# Altium PCB OpenOBW.PcbDoc
Units mm, origin at the board's own origin, x right, y up, seen from the top; angles counter-clockwise.
Board outline 37 x 27 mm, 2 copper layers (Top Layer, Bottom Layer), stack 0.324 mm thick; 43 components, 33 nets, 161 pads, 94 vias.
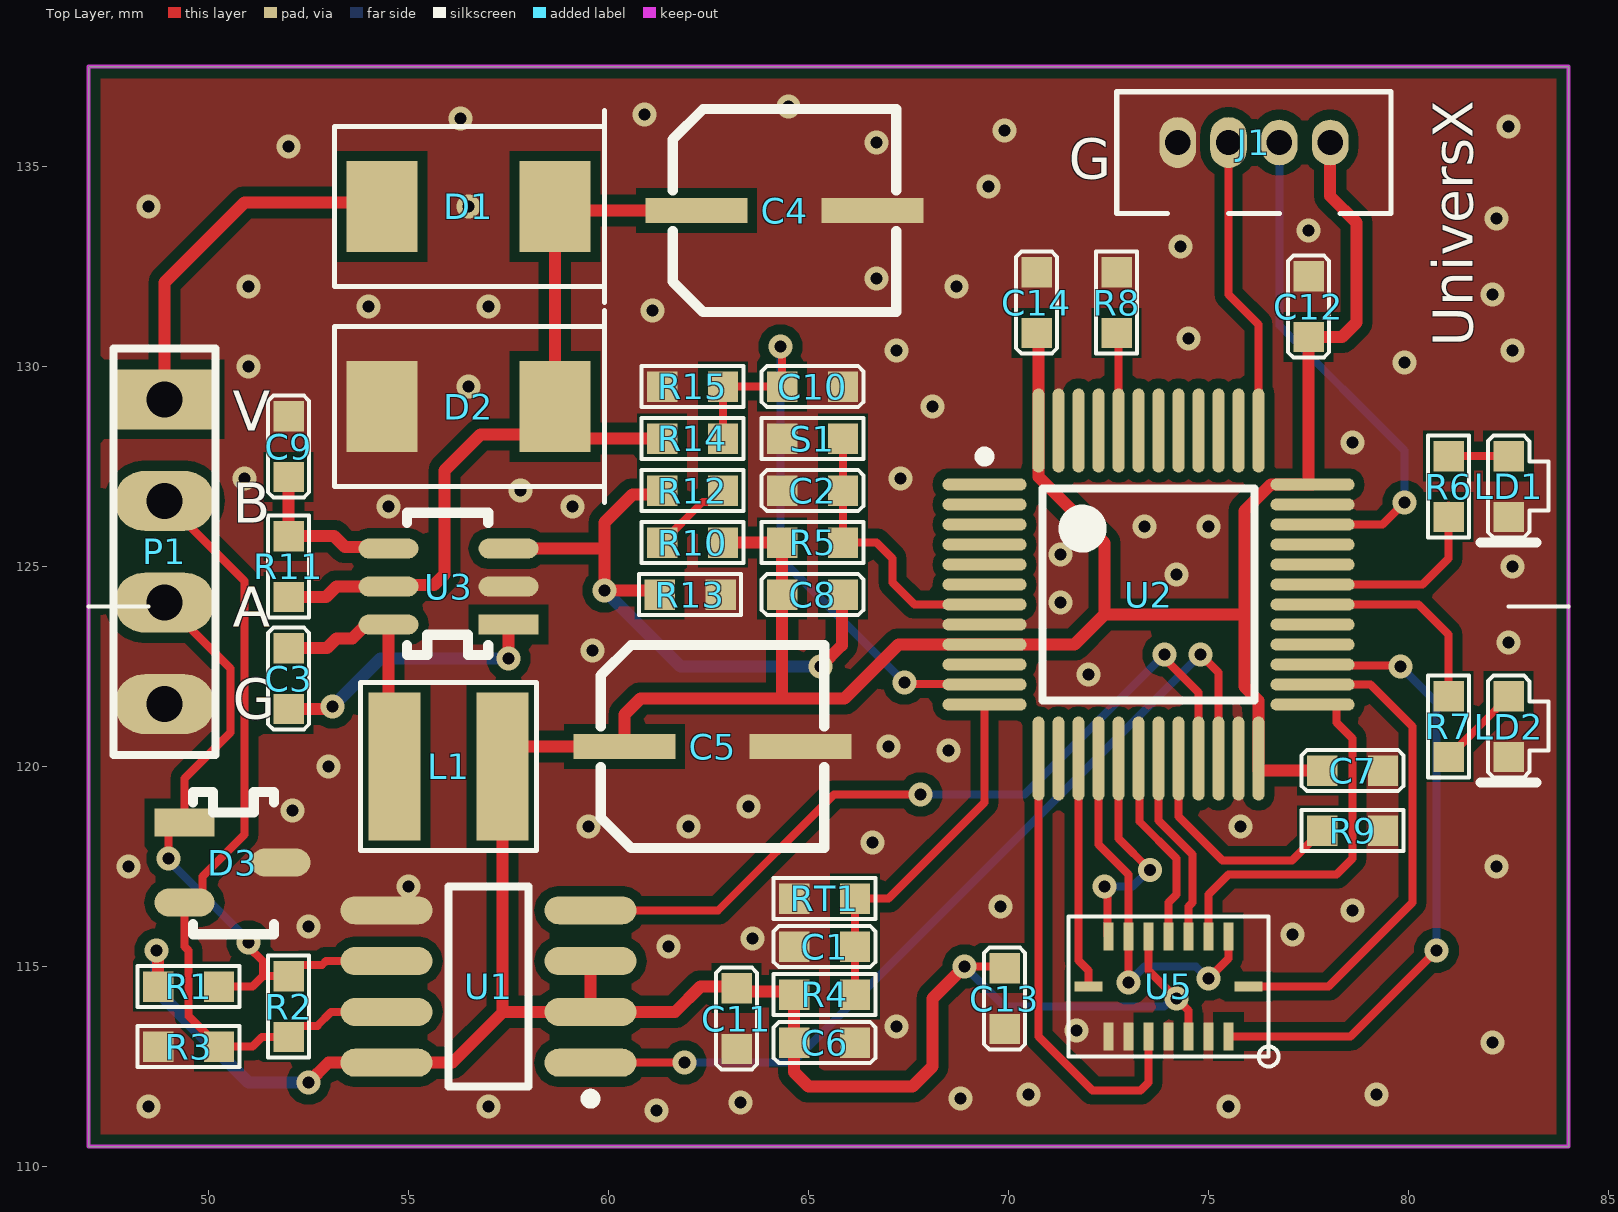
[diagram p0: Top Layer view]
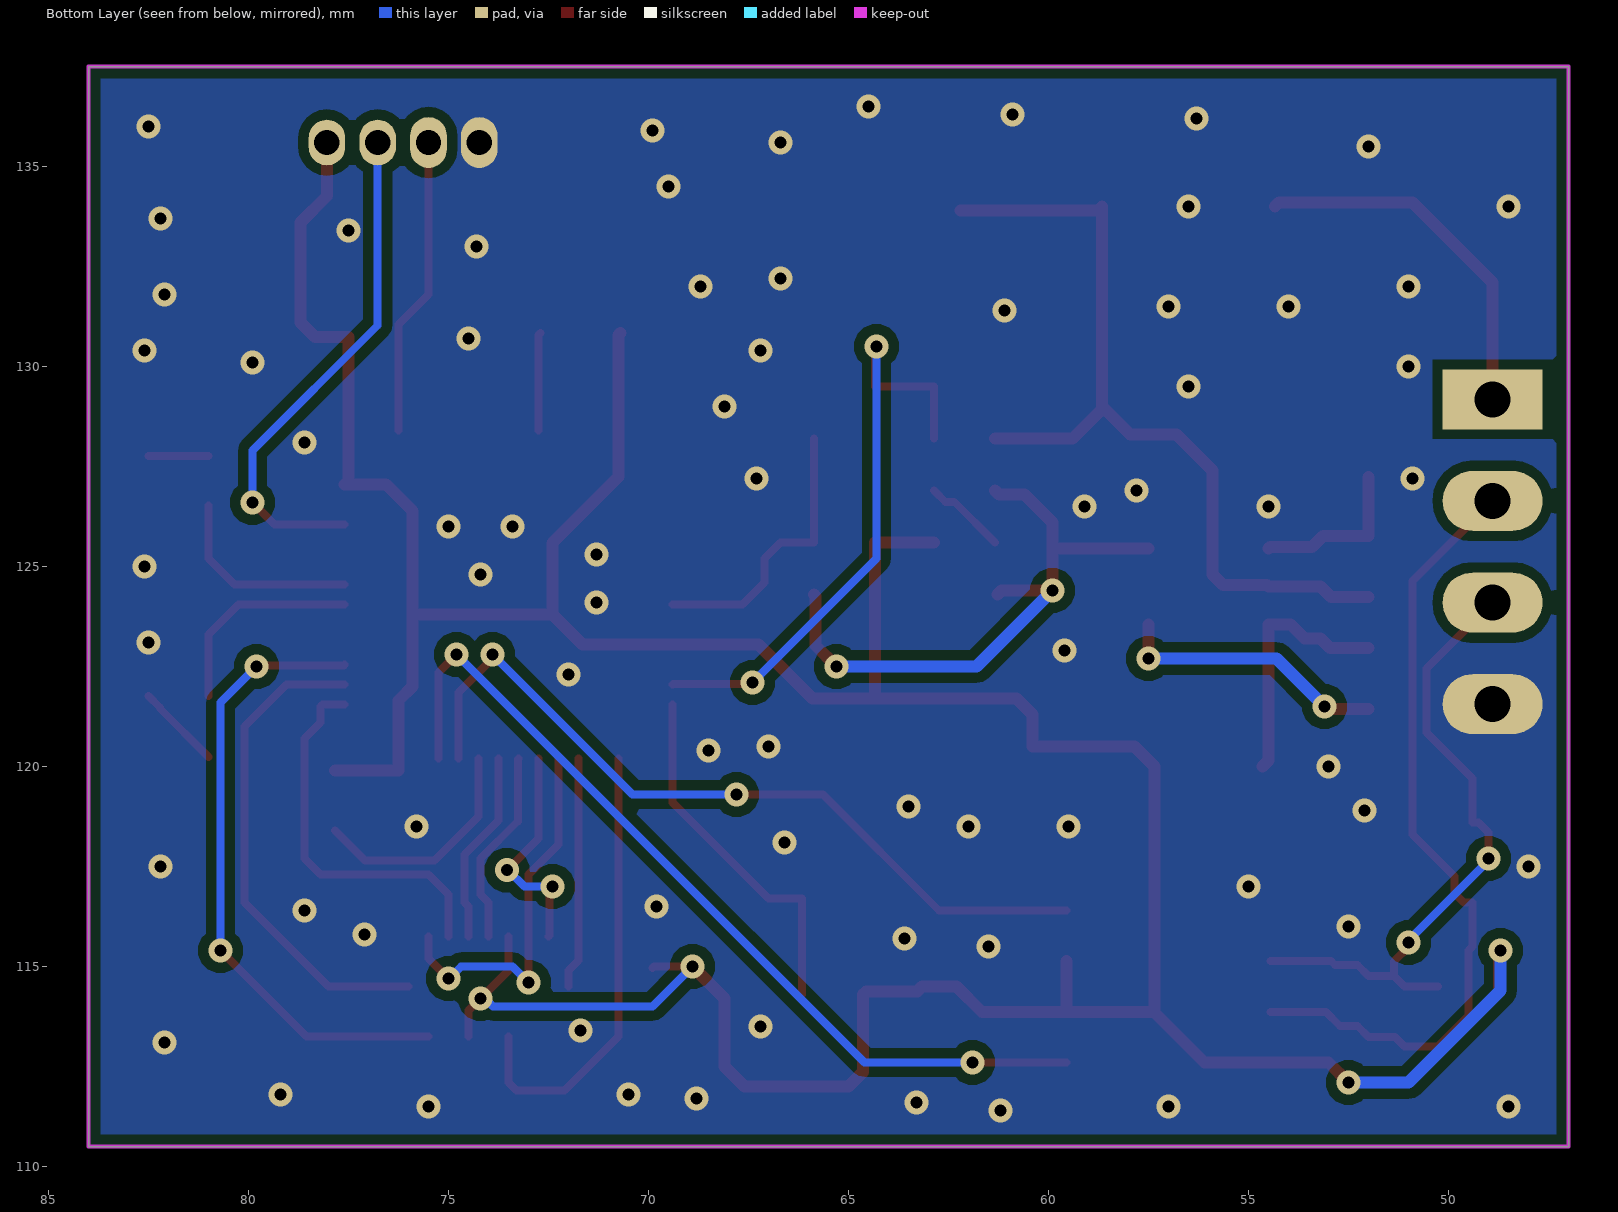
[diagram p1: Bottom Layer view, seen from below]

## Layer stack, top to bottom
Top Solder: solder mask 0.0102, Solder Resist, Dk 3.5
Top Layer: signal copper 0.035
Dielectric 1: core 0.254, FR-4, Dk 4.2
Bottom Layer: signal copper 0.035
Bottom Solder: solder mask 0.0102, Solder Resist, Dk 3.5

## Board outline
47,110.5 47,137.5 84,137.5 84,110.5

## Design rules (kind name [scope] priority, off if disabled: settings)
Clearance Clearance_1 [All vs InPolygon] p1: gap=0.254 ignorepadtopadclearanceinfootprint=FALSE except(0: Arc-Hole Track-Hole SMDPad-Hole THPad-Hole Via-Hole Fill-Hole Poly-Hole Region-Hole Text-Hole)
Clearance [All] p2: gap=0.152 ignorepadtopadclearanceinfootprint=FALSE except(0: Arc-Hole Track-Hole SMDPad-Hole THPad-Hole Via-Hole Fill-Hole Poly-Hole Region-Hole Text-Hole)
ComponentClearance [All] p1: gap=0.254 collisioncheckmode=3 verticalgap=2540 showdistances=FALSE
PlaneConnect [All] p1: planeconnectstyle=Direct reliefexpansion=0.508 reliefentries=4 reliefconductorwidth=0.254 reliefairgap=0.254
PolygonConnect [All] p1: connectstyle=Direct reliefconductorwidth=0.254 reliefentries=4 polygonreliefangle="90 Angle" airgapwidth=0.254
RoutingVias [All] p1: holewidth=0.4 width=0.8 viastyle="Through Hole" minholewidth=0.3 minwidth=0.5 maxholewidth=1 maxwidth=2
SilkToSilkClearance [All] p1 off: silktosilkclearance=0.254
SolderMaskExpansion [All] p1: expansion=0.102 istentingtop=FALSE
Width [All] p1: maxlimit=2.54 minlimit=0.152 preferedwidth=0.254
27 further rules are at their usual default settings.

## Classes and differential pairs
component class power: C3 C4 C5 C6 C7 C8 C9 C10 C11 C12 C13 C14 D1 D2 L1 P1 R10 R11 R12 R13 R14 R15 U3
component class imu: 0.6 R? RP21 RP22 RP23 RP24 RP25 RP26 U5
component class MCU: C1 C2 D3 DC1 J1 LD1 LD2 LD? R1 R2 R3 R4 R5 R6 R7 R8 R9 R110 R112 RT1 S1 U1 U2

## Components (designator, comment, footprint, x,y, rotation, side; value= is the part's Value field where it differs from the comment)
C1 "Cap" 0603C 65.4,115.5 r0 top value=0.1u
C2 "Cap" 0603C 65.1,126.9 r0 top value=0.1u
C3 "Cap" 0603C 52,122.2 r270 top value=0.1u
C4 "Cap Pol1" E0.1 64.4,133.9 r180 top value=10u/50V
C5 "Cap Pol1" E0.1 62.6,120.5 r180 top value=33u/10V
C6 "Cap" 0603C 65.4,113.1 r180 top value=0.1u
C7 "Cap" 0603C 78.6,119.9 r180 top value=0.1u
C8 "Cap" 0603C 65.1,124.3 r180 top value=102
C9 "Cap" 0603C 52,128 r90 top value=0.1u
C10 "Cap" 0603C 65.1,129.5 r180 top value=0.1u
C11 "Cap" 0603C 63.2,113.7 r90 top value=0.1u
C12 "Cap" 0603C 77.5,131.5 r270 top value=0.1u
C13 "Cap" 0603C 69.9,114.2 r90 top value=0.1u
C14 "Cap" 0603C 70.7,131.6 r270 top value=0.1u
D1 "SS110" SMB 56.5,134 r0 top
D2 "SMBJ36CA" SMB 56.5,129 r0 top
D3 "SM712" sot-23 49.1,118.6 r0 top
J1 "Header 4" xhb127-4 78.04,135.6 r180 top
L1 "22uH" MSS4018 56,120 r0 top
LD1 "LED0" 0603d-s 82.5,127 r270 top
LD2 "LED0" 0603d-s 82.5,121 r270 top
P1 "Header 4" HDR1X4 48.9,129.18 r270 top
R1 "Res2" 0603R 49.5,114.5 r0 top value=4.7k
R2 "Res2" 0603R 52,114 r90 top value=DNP
R3 "Res2" 0603R 49.5,113 r0 top value=4.7k
R4 "Res2" 0603R 65.4,114.3 r0 top value=10K
R5 "Res2" 0603R 65.1,125.6 r180 top value=10k
R6 "Res2" 0603R 81,127 r270 top value=510
R7 "Res2" 0603R 81,121 r90 top value=510
R8 "Res2" 0603R 72.7,131.6 r90 top value=100k
R9 "Res2" 0603R 78.6,118.4 r180 top value=100k
R10 "Res2" 0603R 62.1,125.6 r180 top value=30k
R11 "Res2" 0603R 52,125 r90 top value=100k
R12 "Res2" 0603R 62.1,126.9 r0 top value=1.2k
R13 "Res2" 0603R 62.038,124.3 r0 top value=10k
R14 "Res2" 0603R 62.1,128.2 r180 top value=33k
R15 "Res2" 0603R 62.1,129.5 r0 top value=3k
RT1 "10k" 0603R 65.4,116.7 r0 top
S1 "DNP" 0603R 65.1,128.2 r0 top
U1 "MS2548" SOIC127P600-8AM 57,114.5 r180 top
U2 "STM32F103C8T6" TSQFP50P900X900-48M 73.5,124.3 r0 top
U3 "SGM61410" sot-26 57.5,123.55 r180 top
U5 "BMI088" BMI088 74,114.5 r180 top

## Footprints (in the part's own frame and the unit in brackets; to place one, negate y for a bottom-side part, rotate by r counter-clockwise, add the part's x,y. Pads: shape width x height; smd on the part's side, far side on the other; paste and mask are expansions set on the pad)
0603C [mil]
  rect 30x30 smd: 1(-30,0) 2(30,0)
  silkscreen extent -50,-20 50,20
0603d-s [mil]
  rect 30x30 smd: 1(-30,0) 2(30,0)
  silkscreen extent -50,-28 55,39
0603R [mil]
  rect 30x30 smd: 1(-30,0) 2(30,0)
  silkscreen extent -50,-20 50,20
BMI088 [mm]
  rect 0.25x0.7 smd: 1(-1.5,1.25) 2(-1,1.25) 3(-0.5,1.25) 4(0,1.25) 5(0.5,1.25) 6(1,1.25) 7(1.5,1.25) 9(1.5,-1.25) 10(1,-1.25) 11(0.5,-1.25) 12(0,-1.25) 13(-0.5,-1.25) 14(-1,-1.25) 15(-1.5,-1.25)
  rect 0.7x0.25 smd: 8(2,0) 16(-2,0)
  silkscreen extent -2.75,-1.75 2.5,2
E0.1 [mm]
  rect 2.54x0.635 smd: 1(2.2,0) 2(-2.2,0)
  silkscreen extent -2.79,-2.54 2.79,2.54
HDR1X4 [mm] "Connector; Header; 4 Position"
  rect 1.5x2.5 hole 0.9: 1(0,0)
  oval 1.5x2.5 hole 0.9: 2(2.54,0) 3(5.08,0) 4(7.62,0)
  silkscreen extent -1.27,-1.27 8.89,1.27
MSS4018 [mm]
  rect 1.3x3.7 smd: 1(-1.35,0) 2(1.35,0)
  silkscreen extent -2.2,-2.1 2.2,2.1
SMB [mil]
  rect 70x90 smd: 1(-85,0) 2(85,0)
  silkscreen extent -132,-94 134,94
SOIC127P600-8AM [mm] "SOIC, 8-Leads, Body 4.9x3.9mm, Pitch 1.27mm, IPC Low Density"
  oval 2.3x0.7 smd: 1(-2.55,1.905) 2(-2.55,0.635) 3(-2.55,-0.635) 4(-2.55,-1.905) 5(2.55,-1.905) 6(2.55,-0.635) 7(2.55,0.635) 8(2.55,1.905)
  silkscreen extent -2.68,-2.5 1,2.93, body extent -2,-2.5 2,2.5, height 2.72
sot-23 [mm]
  rect 1.5x0.7 smd: 1(0.3,0)
  oval 1.5x0.7 smd: 2(0.3,-2) 3(2.7,-1)
  silkscreen extent 0.51,-2.79 2.54,0.76
sot-26 [mm]
  rect 1.5x0.5 smd: 1(0,0)
  oval 1.5x0.5 smd: 2(0,-0.95) 3(0,-1.9) 4(3,-1.9) 5(3,-0.95) 6(3,0)
  silkscreen extent 0.51,-2.79 2.54,0.76
TSQFP50P900X900-48M [mm] "Thin QFP, 48-Leads, Body 7x7mm, Pitch 0.5mm, IPC Low Density"
  oval 2.1x0.3 smd: 1(-4.1,2.75) 2(-4.1,2.25) 3(-4.1,1.75) 4(-4.1,1.25) 5(-4.1,0.75) 6(-4.1,0.25) 7(-4.1,-0.25) 8(-4.1,-0.75) 9(-4.1,-1.25) 10(-4.1,-1.75) 11(-4.1,-2.25) 12(-4.1,-2.75) 25(4.1,-2.75) 26(4.1,-2.25) 27(4.1,-1.75) 28(4.1,-1.25) 29(4.1,-0.75) 30(4.1,-0.25) 31(4.1,0.25) 32(4.1,0.75) 33(4.1,1.25) 34(4.1,1.75) 35(4.1,2.25) 36(4.1,2.75)
  oval 0.3x2.1 smd: 13(-2.75,-4.1) 14(-2.25,-4.1) 15(-1.75,-4.1) 16(-1.25,-4.1) 17(-0.75,-4.1) 18(-0.25,-4.1) 19(0.25,-4.1) 20(0.75,-4.1) 21(1.25,-4.1) 22(1.75,-4.1) 23(2.25,-4.1) 24(2.75,-4.1) 37(2.75,4.1) 38(2.25,4.1) 39(1.75,4.1) 40(1.25,4.1) 41(0.75,4.1) 42(0.25,4.1) 43(-0.25,4.1) 44(-0.75,4.1) 45(-1.25,4.1) 46(-1.75,4.1) 47(-2.25,4.1) 48(-2.75,4.1)
  silkscreen extent -4.22,-2.65 2.65,3.57, body extent -3.5,-3.5 3.5,3.5, height 1.6
xhb127-4 [mil]
  oval 36x45 hole 25: 1(0,0) 2(50,0)
  oval 36x50 hole 25: 3(100,0) 4(150,0)
  silkscreen extent -60,-50 210,70

## Part data
C1 C2 C3 C6 C7 C8 C9 C10 C11 C12 C13 C14: "Capacitor", LatestRevisionDate=17-Jul-2002, LatestRevisionNote="Re-released for DXP Platform.", PackageDescription="Radial Cap, Thru-Hole; 2 Leads; 0.3 in Pin Spacing", PackageReference=RAD-0.3, Published=8-Jun-2000, Publisher="Altium Limited"
C4 C5: "Polarized Capacitor (Radial)", LatestRevisionDate=17-Jul-2002, LatestRevisionNote="Re-released for DXP Platform.", PackageDescription="Polarized Capacitor (Radial); 2 Leads", PackageReference=RB7.6-15, Published=8-Jun-2000, Publisher="Altium Limited"
D1: library part "D Zener", "Zener Diode", LatestRevisionDate=17-Jul-2002, LatestRevisionNote="Re-released for DXP Platform.", PackageDescription="Diode, Thru-Hole; 2 Leads; 0.7 in Pin Spacing", PackageReference=DIODE-0.7, Published=8-Jun-2000, Publisher="Altium Limited"
D2: library part TVS_B
D3: "7V/12V TVS diodes"
J1 P1: "Header, 4-Pin", LatestRevisionDate=17-Jul-2002, LatestRevisionNote="Re-released for DXP Platform.", Publisher="Altium Limited"
L1: library part "INDUCTORS OF FERRITE", "Power Inductor,3.3uH,0.2,IND_404030", DC Resistor=0.04ohm, Manufacturer=sunlord, Manufacturer PN=SWPA4030S3R3MT, Resonace frequency=38M, Tolerance=20%, Created by=YTL, Irms=2.4A, Isat=3.3A, Part Type=POWER_IND, Priority=A, RK PN=SWPA4030S3R3MT
LD1 LD2: "Typical INFRARED GaAs LED", LatestRevisionDate=08-Jul-2005, LatestRevisionNote="Mech Layer 1 removed.", PackageDescription="LED; 2 Leads", PackageReference=LED-0, Published=8-Jun-2000, Publisher="Altium Limited"
R1 R2 R3 R4 R5 R6 R7 R8 R9 R10 R11 R12 R13 R14 R15: "Resistor", LatestRevisionDate=17-Jul-2002, LatestRevisionNote="Re-released for DXP Platform.", PackageDescription="Axial Device, Thru-Hole; 2 Leads; 0.4 in Pin Spacing", PackageReference=AXIAL-0.4, Published=8-Jun-2000, Publisher="Altium Limited"
RT1: library part "Res Thermal", "Thermistor", Code_IPC=RESC2012, LatestRevisionDate=29-May-2009, LatestRevisionNote="IPC-7351 Footprint Added.", PackageDescription="Chip Resistor 0805 Case Size", PackageReference=6-0805, PackageVersion=Mar-2003, Published=24-Mar-1999, Publisher="Altium Limited"
S1: library part SW-PB, "Switch", LatestRevisionDate=17-Jul-2002, LatestRevisionNote="Re-released for DXP Platform.", PackageDescription="Switch; 2 Leads", PackageReference=SPST-2, Published=24-Mar-1999, Publisher="Altium Limited"
U1: library part MAX13487
U2: library part STM32F101C8T6, "STM32 ARM-based 32-bit MCU with 64 Kbytes Flash, 48-pin LQFP, Industrial Temperature", ComponentLink1Description="Manufacturer Link", ComponentLink1URL=www.st.com/stm32, ComponentLink2Description=Datasheet, ComponentLink2URL=http://www.st.com/stonline/products/literature/ds/13586.pdf, DatasheetVersion="rev6, Mar-2008", PackageDescription="48-Pin Low-Profile Quad Flat Pack, 7 x 7 mm Body, 0.5 mm Pitch (LQFP48)", PackageReference=LQFP48, PackageVersion=Mar-2008, Published=30-May-2008, Publisher="Altium Limited"
U3: library part RY8310

## Via types
v1: diameter 0.6, hole 0.3, Top Layer to Bottom Layer, 94 vias

## Nets (pads, with @x,y where several pads share a name; then routed paths per layer and width w, separated by ;. In a path a pad name is that pad's centre, name@x,y a point inside that pad or via, vN(x,y) a via of type N, cw(c..) or ccw(c..) an arc to the next point about the centre after c; other vN are vias at no path point)
BOOT0: R8.1 U2.44 | length 2.5
  Top Layer w0.2: R8.1 72.75,130.788 U2.44
BOOT1: R9.2 U2.20 | length 5.8
  Top Layer w0.2: U2.20 74.25,118.75 75.348,117.652 77.09,117.652 R9.2
GND: C1.1 C2.1 C4.2 C5.2 C6.1 C7.1 C9.2 C10.1 C11.1 C12.1 C13.1 C14.1 D2.1 D3.3 J1.4 LD1.2 LD2.2 P1.4 R3.1 R8.2 R9.1 R13.2 R15.1 RT1.1 S1.1 U1.5 U2.8 U2.23 U2.35 U2.47 U3.2 U5.2 U5.4 U5.6 U5.7
  other v1: 61.2,111.4 48.5,111.5 57,111.5 75.5,111.5 63.3,111.6 68.8,111.7 70.5,111.8 79.2,111.8 82.1,113.1 71.7,113.4 67.2,113.5 61.5,115.5 63.6,115.7 77.1,115.8 52.5,116 78.6,116.4 69.8,116.5 55,117 48,117.5 82.2,117.5 66.6,118.1 59.5,118.5 62,118.5 75.8,118.5 52.1,118.9 63.5,119 53,120 68.5,120.4 67,120.5 72,122.3 59.6,122.9 82.5,123.1 71.3,124.1 74.2,124.8 82.6,125 71.3,125.3 73.4,126 75,126 54.5,126.5 59.1,126.5 57.8,126.9 50.9,127.2 67.3,127.2 78.6,128.1 68.1,129 56.5,129.5 51,130 79.9,130.1 67.2,130.4 82.6,130.4 74.5,130.7 61.1,131.4 54,131.5 57,131.5 82.1,131.8 51,132 68.7,132 66.7,132.2 74.3,133 77.5,133.4 82.2,133.7 48.5,134 56.5,134 69.5,134.5 52,135.5 66.7,135.6 69.9,135.9 82.5,136 56.3,136.2 60.9,136.3 64.5,136.5
INTA1: U2.26 U5.16 | length 12.3
  Top Layer w0.2: U5.16 78,114.5 80.1,116.6 80.1,121 79.05,122.05 U2.26
INTA2: U2.27 U5.1 | length 15.8
  Top Layer w0.2: U5.1 78.55,113.25 v1(80.7,115.4) ; U2.27 77.619,122.531 79.769,122.531 v1(79.8,122.5)
  Bottom Layer w0.2: v1(79.8,122.5) 80.7,121.6 v1(80.7,115.4)
INTG1: U2.18 U5.12 | length 4.9
  Top Layer w0.2: U2.18 73.269,120.181 73.269,118.631 74.2,117.7 74.2,116.8 74,116.6 U5.12
INTG2: U2.19 U5.13 | length 4.8
  Top Layer w0.2: U2.19 73.75,118.648 74.6,117.798 74.6,116.6 74.5,116.5 U5.13
LED1: R6.2 U2.31 | length 5
  Top Layer w0.2: U2.31 80.35,124.55 81,125.2 R6.2@81,126.523
LED2: R7.2 U2.30 | length 5.2
  Top Layer w0.2: U2.30 80.25,124.05 81,123.3 R7.2
MISO: U2.16 U5.10 U5.15 | length 9.5
  Top Layer w0.2: U2.16 72.25,118.05 73,117.3 U5.10 v1(73,114.6) ; v1(75,114.7) 75.5,115.2 U5.15
  Bottom Layer w0.2: v1(73,114.6) 73.4,115 74.683,115 74.983,114.7 v1(75,114.7)
MOSI: U2.17 U5.9 | length 5.7
  Top Layer w0.2: v1(72.4,117) 72.475,116.925 72.475,115.775 U5.9 ; U2.17 72.75,118.2 v1(73.542,117.408)
  Bottom Layer w0.2: v1(72.4,117) 73.101,117 73.51,117.408 v1(73.542,117.408)
nCSBA: U2.25 U5.14 | length 9.6
  Top Layer w0.2: U5.14 75,116.8 75.5,117.3 78.2,117.3 78.6,117.7 78.6,120.7 78.2,121.1 78.2,121.504 78.154,121.55 U2.25
nCSBG: U2.13 U5.5 | length 11.5
  Top Layer w0.2: U2.13 70.75,113.25 72.1,111.9 73.3,111.9 73.5,112.1 U5.5
NetC3_1: C3.1 L1.1 U3.6 | length 6.4
  Top Layer w0.3: C3.1 52.962,122.962 53.2,123.2 53.596,123.2 53.946,123.55 U3.6 54.5,120.15 L1.1
NetC3_2: C3.2 U3.1 | length 6.9
  Top Layer w0.3: C3.2 52.938,121.438 53,121.5 v1(53.1,121.5) ; v1(57.5,122.7) U3.1
  Bottom Layer w0.3: v1(53.1,121.5) 54.3,122.7 v1(57.5,122.7)
NetC8_1: C8.1 R12.1 R13.1 U3.3 | length 15.5
  Top Layer w0.3: U3.3 59.9,125.45 ; R13.1 61.176,124.4 v1(59.9,124.4) 59.9,125.45 ; R12.1 61.238,126.8 60.6,126.8 59.9,126.1 59.9,125.45 ; v1(65.3,122.5) 65.831,123.031 65.831,124.269 C8.1
  Bottom Layer w0.3: v1(59.9,124.4) 61.8,122.5 v1(65.3,122.5)
NetC9_1: C9.1 R11.2 U3.4 | length 4.1
  Top Layer w0.3: C9.1 R11.2 53.138,125.762 53.412,125.488 54.462,125.488 U3.4
NetLD1_1: LD1.1 R6.1 | length 1.5
  Top Layer w0.2: R6.1 LD1.1
NetLD2_1: LD2.1 R7.1 | length 2.1
  Top Layer w0.2: R7.1 82.219,121.457 82.219,121.481 LD2.1
NetR10_2: R10.2 R12.2 | length 2.1
  Top Layer w0.2: R10.2 62.357,126.619 62.581,126.619 R12.2
NRST: C2.2 R5.1 S1.2 U2.7 | length 7.1
  Top Layer w0.2: S1.2 C2.2 R5.1 66.7,125.6 67.1,125.2 67.1,124.6 67.65,124.05 U2.7
RS485A: D3.1 P1.3 R1.2 R2.2 U1.6 | length 16.2
  Top Layer w0.2: P1.3 50.548,122.452 50.548,120.848 49.4,119.7 D3.1 49.25,118.6 49,118.35 v1(49,117.7) ; R1.2 51.1,114.5 51.362,114.762 ; v1(51,115.6) 51,115.492 51.362,115.13 51.362,114.762 ; U1.6 52.935,115.135 52.843,115.043 52.281,115.043 R2.2 51.362,114.762
  Bottom Layer w0.2: v1(49,117.7) 49,117.65 51,115.65 v1(51,115.6)
RS485B: D3.2 P1.2 R2.1 R3.2 U1.7 | length 20.1
  Top Layer w0.2: P1.2 50.9,124.64 50.9,118.3 49.85,117.25 49.85,116.831 49.619,116.6 D3.2 49.4,115.5 49.5,115.4 49.5,113.762 R3.2 51.1,113 51.338,113.238 R2.1 52.281,113.519 52.719,113.519 53.065,113.865 U1.7
SCK: U2.15 U5.8 | length 5.8
  Top Layer w0.2: U2.15 71.75,115.15 72,114.9 U5.8
SWCLK: J1.3 U2.37 | length 7.5
  Top Layer w0.2: J1.3 75.5,131.8 76.25,131.05 U2.37
SWIO: J1.2 U2.34 | length 12.8
  Top Layer w0.2: U2.34 79.35,126.05 v1(79.9,126.6)
  Bottom Layer w0.2: J1.2 76.77,131.03 79.9,127.9 v1(79.9,126.6)
TEMP: C1.2 R4.2 RT1.2 U2.12 | length 9.1
  Top Layer w0.2: R4.2 C1.2 RT1.2 67,116.7 69.4,119.1 U2.12
URX3: U1.1 U2.22 | length 22.3
  Top Layer w0.2: U1.1 59.553,112.598 61.898,112.598 v1(61.9,112.6) ; v1(74.8,122.8) 75.25,122.35 U2.22
  Bottom Layer w0.2: v1(61.9,112.6) 64.6,112.6 v1(74.8,122.8)
UTX3: U1.4 U2.21 | length 20
  Top Layer w0.2: U1.4 62.743,116.405 65.638,119.3 v1(67.8,119.3) ; v1(73.9,122.8) 73.9,122.7 74.75,121.85 U2.21
  Bottom Layer w0.2: v1(67.8,119.3) 70.4,119.3 v1(73.9,122.8)
V33: C5.1 C6.2 C7.2 C8.2 C11.2 C12.2 C13.2 C14.2 J1.1 L1.2 R1.1 R4.1 R5.2 R10.1 U1.2 U1.3 U1.8 U2.9 U2.24 U2.36 U2.48 U5.3 U5.11 | length 99.2
  Top Layer w0.2: v1(68.9,115) 69.862,115 C13.2 ; U5.11 73.5,114.9 v1(74.2,114.2) 74.2,114.198 74.5,113.898 U5.3
  Top Layer w0.3: v1(48.7,115.4) 48.738,115.362 R1.1 ; v1(52.5,112.1) 52.995,112.595 U1.8 56.095,112.595 57.365,113.865 ; U1.3 U1.2 ; R10.1 R5.2 C8.2 64.338,121.7 ; v1(68.9,115) 68.1,114.2 68.1,112.5 67.6,112 65,112 64.638,112.362 C6.2 R4.1 64.557,114.381 63.281,114.381 C11.2 63.162,114.5 62.3,114.5 61.665,113.865 U1.2 ; C14.2 70.75,130.788 U2.48 70.75,127.24 72.4,125.59 72.4,123.8 ; 75.8,123.8 72.4,123.8 ; U2.36 U2.36@77.5,127.05 ; C7.2 76.25,119.9 U2.24 76.25,121.36 76.248,121.363 76.248,121.652 75.9,122 75.9,126.39 76.56,127.05 U2.36@77.5,127.05 ; J1.1 78.04,134.26 78.7,133.6 78.7,131.1 78.338,130.738 C12.2 U2.36@77.5,127.05 ; 57.365,113.865 57.35,113.88 L1.2 57.85,120.5 C5.1 60.4,121.3 60.8,121.7 64.338,121.7 ; 57.365,113.865 U1.2 ; 64.338,121.7 65.9,121.7 67.25,123.05 U2.9 71.65,123.05 72.4,123.8
  Bottom Layer w0.2: v1(68.9,115) 69.9,114 73.892,114 74.092,114.2 v1(74.2,114.2)
  Bottom Layer w0.3: v1(48.7,115.4) 48.7,114.4 51,112.1 v1(52.5,112.1)
Vin: D1.1 P1.1 | length 9.2
  Top Layer w0.3: P1.1 48.9,132.1 50.9,134.1 54.241,134.1 D1.1
VINSEN: C10.2 R14.1 R15.2 U2.11 | length 15.5
  Top Layer w0.2: R14.1 R15.2 C10.2 64.338,130.462 v1(64.3,130.5) ; v1(67.4,122.1) 67.431,122.069 69.381,122.069 U2.11
  Bottom Layer w0.2: v1(64.3,130.5) 64.3,125.2 v1(67.4,122.1)
Vpp: C4.1 D1.2 D2.2 R11.1 R14.2 U3.5 | length 21.8
  Top Layer w0.3: R11.1 52.938,124.238 53.2,124.5 U3.5 54.538,124.538 55.638,124.538 55.9,124.8 55.9,127.4 56.8,128.3 57.959,128.3 D2.2 ; R14.2 59.398,128.2 58.659,128.939 D2.2 ; C4.1 58.759,133.9 D1.2 D2.2
pads on no net: U2.1 U2.2 U2.3 U2.4 U2.5 U2.6 U2.10 U2.14 U2.28 U2.29 U2.32 U2.33 U2.38 U2.39 U2.40 U2.41 U2.42 U2.43 U2.45 U2.46

## Polygon pours and split planes (outlines as drawn)
GND on Bottom Layer "GND_L01_P-001" (solid, remove dead copper, pour order 1): 47,137.5 84,137.5 84,110.5 47,110.5
GND on Top Layer "GND_L01_P-001" (solid, remove dead copper, pour order 0): 47,137.5 84,137.5 84,110.5 47,110.5

## Keep-outs
Keep-Out Layer:
  the board outline again, w0.1

## Silkscreen, mask and mechanical layers (free items; w line width, h text height)
Top Overlay:
  lines w0.1: 47,124 48.5,124 ; 82.5,124 84,124
  text "G" at 71.5,134.7 h1
  text "UniversX" at 81.6,130.5 h1 r90
  text "V" at 50.6,128.4 h1
  text "B" at 50.6,126.1 h1
  text "A" at 50.6,123.5 h1
  text "G" at 50.6,121.2 h1

## Dimensions
84,137.5 to 84,110.5 on Top Overlay
47,137.5 to 84,137.5 on Top Overlay